# Altium PCB PCB.PcbDoc (part 5 of 10)
Units mm, origin at the board's own origin, x right, y up, seen from the top; angles counter-clockwise.
Board outline 100.5 x 147.95 mm, 6 copper layers (Top Layer, Layer 2 (GND), Layer 3, Layer 4, Layer 5 (AGND), Bottom Layer), stack 1.449 mm thick; 511 components, 297 nets, 1620 pads, 565 vias.
Unrouted connection lines stored in the file: 597.
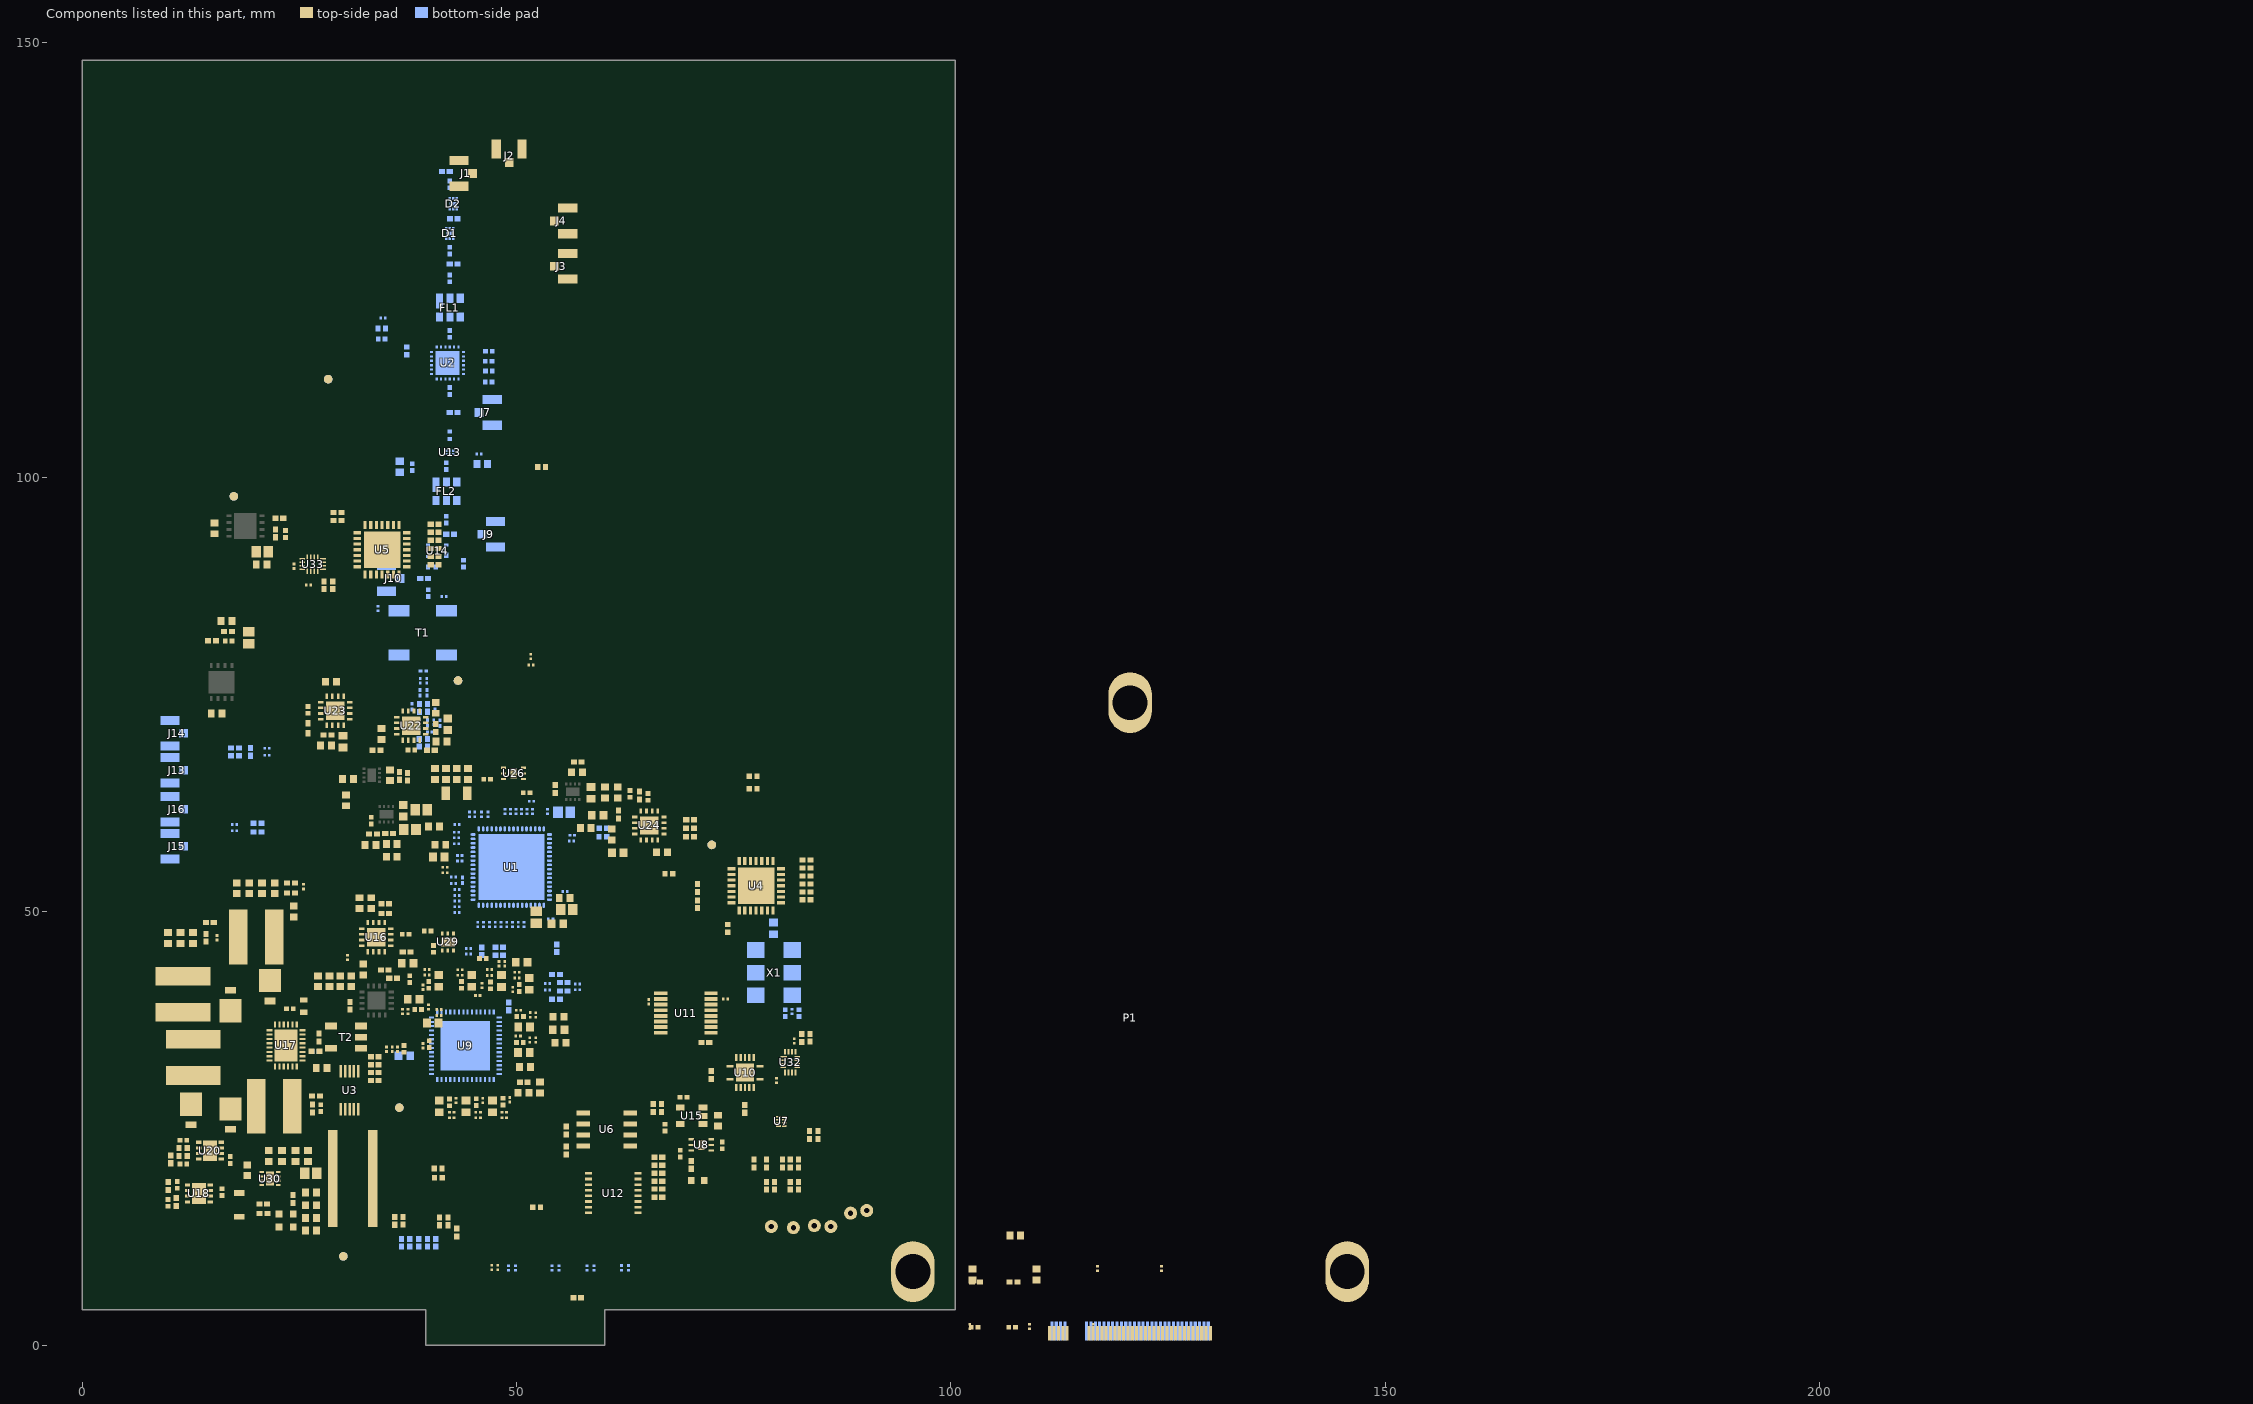
[diagram p4: the components of this part, seen from the top]

## Part data (continued)
R46: library part Resistor, Case Code (Imperial)=0603, Case Code (Metric)=1608, Manufacturer 1=Panasonic, Manufacturer Part Number 1=ERJ-3EKF15R0V, Max Operating Temperature=155°C, Max Power Dissipation=100mW, Min Operating Temperature=-55°C, Package Quantity=1, Supplier Part Number 1=P15.0HCT-ND, Temperature Coefficient=100ppm/°C, Tolerance=1%, Voltage Rating=75V, Case/Package=0603, ComponentLink1Description=https://datasheet.ciiva.com/30238/aoa0000ce2-30238940.pdf?src-supplier=Onlinecomponents.com, ComponentLink1URL=https://datasheet.ciiva.com/30238/aoa0000ce2-30238940.pdf?src-supplier=Onlinecomponents.com, ComponentLink2Description=https://datasheet.ciiva.com/5915/aoa0000ce2-5915293.pdf?src-supplier=Farnell, ComponentLink2URL=https://datasheet.ciiva.com/5915/aoa0000ce2-5915293.pdf?src-supplier=Farnell, ComponentLink3Description=https://datasheet.ciiva.com/9192/aoa0000ce2-9192958.pdf?src-supplier=Avnet, ComponentLink3URL=https://datasheet.ciiva.com/9192/aoa0000ce2-9192958.pdf?src-supplier=Avnet, ComponentLink4Description=https://datasheet.ciiva.com/46373/1678782-46373800.pdf?src-supplier=Element14, ComponentLink4URL=https://datasheet.ciiva.com/46373/1678782-46373800.pdf?src-supplier=Element14, ComponentLink5Description=https://datasheet.ciiva.com/46373/1678782-46373801.pdf?src-supplier=Element14, ComponentLink5URL=https://datasheet.ciiva.com/46373/1678782-46373801.pdf?src-supplier=Element14, ComponentLink6Description=https://datasheet.ciiva.com/16770/70260748-16770860.pdf?src-supplier=Allied+Electronics, ComponentLink6URL=https://datasheet.ciiva.com/16770/70260748-16770860.pdf?src-supplier=Allied+Electronics, ComponentLink7Description=https://datasheet.ciiva.com/22682/1678782-22682189.pdf?src-supplier=Element14, ComponentLink7URL=https://datasheet.ciiva.com/22682/1678782-22682189.pdf?src-supplier=Element14, Composition="Thick Film", Contact Plating=Tin, Depth=0.8mm, Features="Automotive AEC-Q200", Height=0.022inch, Lead Free="Lead Free", Length=1.6mm, Military Standard=Not, Mount="Surface Mount", Number of Pins=2, Number of Terminations=2, Packaging="Tape and Reel", Power Rating=100mW, Pricing 1="1=0.10000, 10=0.06500, 100=0.02640, 1000=0.01186, 2500=0.01029 (USD)", Radiation Hardening=No, REACH SVHC="No SVHC", Resistance=15R, RoHS=Yes, Stock 1=100546, Supplier 1=Digi-Key, Termination=SMD/SMT, Voltage Rating (DC)=75V, Weight=7.1E-05oz, Width=0.031inch, Working Voltage=75V
R50 R65 R86: library part Resistor, Case Code (Imperial)=0402, Case Code (Metric)=1005, Manufacturer 1=Susumu, Manufacturer Part Number 1=RR0510P-104-D, Max Operating Temperature=125°C, Max Power Dissipation=63mW, Min Operating Temperature=-55°C, Package Quantity=1, Supplier Part Number 1=RR05P100KDCT-ND, Temperature Coefficient=25ppm/°C, Tolerance=0.5%, Voltage Rating=25V, Case/Package=0402, ComponentLink1Description=https://datasheet.ciiva.com/2486/rr-data-sheet-2486809.pdf?src-supplier=Digi-Key, ComponentLink1URL=https://datasheet.ciiva.com/2486/rr-data-sheet-2486809.pdf?src-supplier=Digi-Key, ComponentLink2Description=https://datasheet.ciiva.com/2486/rr-data-sheet-2486810.pdf?src-supplier=Digi-Key, ComponentLink2URL=https://datasheet.ciiva.com/2486/rr-data-sheet-2486810.pdf?src-supplier=Digi-Key, ComponentLink3Description=https://datasheet.ciiva.com/2486/rr-data-sheet-2486811.pdf?src-supplier=Digi-Key, ComponentLink3URL=https://datasheet.ciiva.com/2486/rr-data-sheet-2486811.pdf?src-supplier=Digi-Key, Composition="Thin Film", Height=0.016inch, Lead Free="Lead Free", Length=0.039inch, Number of Pins=2, Number of Terminations=2, Packaging="Tape and Reel", Power Rating=63mW, Pricing 1="1=0.10000, 10=0.07400, 100=0.02850, 1000=0.01254, 2500=0.01083, 5000=0.00969 (USD)", REACH SVHC="No SVHC", Resistance=100kR, RoHS=Yes, Supplier 1=Digi-Key, Termination=SMD/SMT, Voltage Rating (DC)=25V, Width=0.02inch, Working Voltage=25V
  R50 R86: Stock 1=211732
  R65: Stock 1=221998
R51 R66: library part Resistor, Case Code (Imperial)=0402, Case Code (Metric)=1005, Manufacturer 1=Susumu, Manufacturer Part Number 1=RR0510P-2492-D, Max Operating Temperature=125°C, Max Power Dissipation=63mW, Min Operating Temperature=-55°C, Package Quantity=1, Power Rating=62.5mW, Supplier Part Number 1=RR05P24.9KDCT-ND, Temperature Coefficient=25ppm/°C, Tolerance=0.5%, Voltage Rating=25V, Voltage Rating (DC)=50V, Case/Package=0402, ComponentLink1Description=https://datasheet.ciiva.com/2525/rr-data-sheet-2525146.pdf?src-supplier=Digi-Key, ComponentLink1URL=https://datasheet.ciiva.com/2525/rr-data-sheet-2525146.pdf?src-supplier=Digi-Key, ComponentLink2Description=https://datasheet.ciiva.com/2525/rr-data-sheet-2525147.pdf?src-supplier=Digi-Key, ComponentLink2URL=https://datasheet.ciiva.com/2525/rr-data-sheet-2525147.pdf?src-supplier=Digi-Key, ComponentLink3Description=https://datasheet.ciiva.com/2525/rr-data-sheet-2525148.pdf?src-supplier=Digi-Key, ComponentLink3URL=https://datasheet.ciiva.com/2525/rr-data-sheet-2525148.pdf?src-supplier=Digi-Key, Composition="Thin Film", Height=0.016inch, Lead Free="Lead Free", Length=0.039inch, Number of Terminations=2, Packaging="Tape and Reel", Pricing 1="1=0.10000, 10=0.07400, 100=0.02850, 1000=0.01254, 2500=0.01083, 5000=0.00969 (USD)", Resistance=24.9kR, RoHS=Yes, Supplier 1=Digi-Key, Termination=SMD/SMT, Weight=2.3E-05oz, Width=0.5mm, Working Voltage=25V
  R51: Stock 1=39015
  R66: Stock 1=40830
R52: library part Resistor, Case/Package=0402, Manufacturer 1="Stackpole Electronics", Manufacturer Part Number 1=RNCF0402DTE21K5, Max Operating Temperature=155°C, Max Power Dissipation=63mW, Min Operating Temperature=-55°C, Package Quantity=10000, Supplier Part Number 1=RNCF0402DTE21K5CT-ND, Temperature Coefficient=25ppm/°C, Tolerance=0.5%, ComponentLink1Description=https://www.seielect.com/Catalog/SEI-RNCF.pdf?src-supplier=Digi-Key, ComponentLink1URL=https://www.seielect.com/Catalog/SEI-RNCF.pdf?src-supplier=Digi-Key, Composition="Thin Film", Features="Moisture Resistant", Height=0.016inch, Length=0.039inch, Mount="Surface Mount", Number of Terminations=2, Packaging="Tape and Reel", Pricing 1="1=0.13000, 10=0.11400, 25=0.07920, 50=0.06160, 100=0.04400, 250=0.03432, 500=0.02728, 1000=0.01936, 5000=0.01496 (USD)", Resistance=21.5kR, RoHS=Yes, Stock 1=19890, Supplier 1=Digi-Key, Width=0.02inch
R56: library part Resistor, "Thin Film Resistors 31.2kOhm,0402,0.5%,2 5ppm,63mW,50V", Case Code (Imperial)=0402, Case Code (Metric)=1005, Manufacturer="KOA Speer", Manufacturer Part Number=RN73H1ETTP3122D25, Max Operating Temperature=155°C, Min Operating Temperature=-55°C, Power Rating=63mW, Supplier Part Number 1=2019-RN73H1ETTP3122D25CT-ND, Temperature Coefficient=25ppm/°C, Tolerance=0.5%, Voltage Rating=50V, Case/Package=0402, Category=Resistors, ComponentLink1Description=http://www.mouser.com/ds/2/219/RN73H-12200.pdf?src-supplier=Mouser, ComponentLink1URL=http://www.mouser.com/ds/2/219/RN73H-12200.pdf?src-supplier=Mouser, Composition="Metal Film", Height=0.35mm, Length=1mm, Packaging="Tape and Reel", Pricing 1="1=0,49000, 10=0,37200, 100=0,15630, 1000=0,08624, 2500=0,08085, 5000=0,07330 (USD)", Resistance=31.2kR, RoHS=No, Stock 1=14677, Supplier 1=Digi-Key, Termination=SMD/SMT, Voltage Rating (DC)=50V, Weight=2.3E-05oz, Width=0.5mm
R57: library part Resistor, Case Code (Imperial)=0402, Case Code (Metric)=1005, Manufacturer 1=Susumu, Manufacturer Part Number 1=RR0510P-1822-D, Max Operating Temperature=125°C, Max Power Dissipation=63mW, Min Operating Temperature=-55°C, Package Quantity=1, Power Rating=62.5mW, Supplier Part Number 1=RR05P18.2KDCT-ND, Temperature Coefficient=25ppm/°C, Tolerance=0.5%, Voltage Rating=25V, Voltage Rating (DC)=50V, Case/Package=0402, ComponentLink1Description=https://datasheet.ciiva.com/2494/rr-data-sheet-2494006.pdf?src-supplier=Digi-Key, ComponentLink1URL=https://datasheet.ciiva.com/2494/rr-data-sheet-2494006.pdf?src-supplier=Digi-Key, ComponentLink2Description=https://datasheet.ciiva.com/2494/rr-data-sheet-2494007.pdf?src-supplier=Digi-Key, ComponentLink2URL=https://datasheet.ciiva.com/2494/rr-data-sheet-2494007.pdf?src-supplier=Digi-Key, ComponentLink3Description=https://datasheet.ciiva.com/2494/rr-data-sheet-2494008.pdf?src-supplier=Digi-Key, ComponentLink3URL=https://datasheet.ciiva.com/2494/rr-data-sheet-2494008.pdf?src-supplier=Digi-Key, Composition="Thin Film", Height=0.016inch, Lead Free="Lead Free", Length=0.039inch, Number of Terminations=2, Packaging="Tape and Reel", Pricing 1="1=0.10000, 10=0.07400, 100=0.02850, 1000=0.01254, 2500=0.01083, 5000=0.00969 (USD)", Resistance=18.2kR, RoHS=Yes, Stock 1=48500, Supplier 1=Digi-Key, Termination=SMD/SMT, Width=0.02inch
R59: library part Resistor, Case Code (Imperial)=0402, Case Code (Metric)=1005, Manufacturer 1=Panasonic, Manufacturer Part Number 1=ERA-2AEB6192X, Max Operating Temperature=155°C, Max Power Dissipation=63mW, Min Operating Temperature=-55°C, Package Quantity=1, Supplier Part Number 1=P61.9KDCCT-ND, Temperature Coefficient=25ppm/°C, Tolerance=0.1%, Voltage Rating=25V, Voltage Rating (DC)=50V, Case/Package=0402, ComponentLink1Description=https://datasheet.ciiva.com/24058/aoa0000ce26-32660-24058744.pdf?src-supplier=Mouser, ComponentLink1URL=https://datasheet.ciiva.com/24058/aoa0000ce26-32660-24058744.pdf?src-supplier=Mouser, Composition="Thin Film,Metal Film", Contact Plating=Tin, Features="Automotive AEC-Q200", Height=0.016inch, Lead Free="Lead Free", Length=0.039inch, Mount="Surface Mount", Number of Terminations=2, Packaging="Tape and Reel", Power Rating=63mW, Pricing 1="1=0.45000, 10=0.32100, 100=0.12830, 1000=0.06322, 2500=0.05858, 5000=0.05300 (USD)", Radiation Hardening=No, REACH SVHC=Unknown, Resistance=61.9kR, RoHS=Yes, Stock 1=12743, Supplier 1=Digi-Key, Termination=SMD/SMT, Width=0.02inch
R60: library part Resistor, Case Code (Imperial)=0402, Case Code (Metric)=1005, Manufacturer 1=Panasonic, Manufacturer Part Number 1=ERA-2AEB1052X, Max Operating Temperature=155°C, Max Power Dissipation=63mW, Min Operating Temperature=-55°C, Package Quantity=1, Supplier Part Number 1=P10.5KDCCT-ND, Temperature Coefficient=25ppm/°C, Tolerance=0.1%, Voltage Rating=25V, Voltage Rating (DC)=50V, Case/Package=0402, ComponentLink1Description=http://www.mouser.com/ds/2/315/AOA0000CE26-32660.pdf?src-supplier=Mouser, ComponentLink1URL=http://www.mouser.com/ds/2/315/AOA0000CE26-32660.pdf?src-supplier=Mouser, ComponentLink2Description=https://media.digikey.com/pdf/Data%20Sheets/Panasonic%20Resistors%20Thermistors%20PDFs/ERA_Series_LE.pdf?src-supplier=Digi-Key, ComponentLink2URL=https://media.digikey.com/pdf/Data%20Sheets/Panasonic%20Resistors%20Thermistors%20PDFs/ERA_Series_LE.pdf?src-supplier=Digi-Key, ComponentLink3Description=http://www.onlinecomponents.com/datasheet/era-2aeb1052x.aspx?p=44473930&src-supplier=Onlinecomponents.com, ComponentLink3URL=http://www.onlinecomponents.com/datasheet/era-2aeb1052x.aspx?p=44473930&src-supplier=Onlinecomponents.com, ComponentLink4Description=http://www.farnell.com/datasheets/2052875.pdf?src-supplier=Newark, ComponentLink4URL=http://www.farnell.com/datasheets/2052875.pdf?src-supplier=Newark, ComponentLink5Description=https://industrial.panasonic.com/cdbs/www-data/pdf/RDM0000/AOA0000C307.pdf?src-supplier=Digi-Key, ComponentLink5URL=https://industrial.panasonic.com/cdbs/www-data/pdf/RDM0000/AOA0000C307.pdf?src-supplier=Digi-Key, Composition="Metal Film,Thin Film", Features="Automotive AEC-Q200", Height=0.016inch, Lead Free="Lead Free", Length=0.039inch, Mount="Surface Mount", Number of Terminations=2, Packaging="Tape and Reel", Power Rating=63mW, Pricing 1="1=0.45000, 10=0.32100, 100=0.12830, 1000=0.06322, 2500=0.05858, 5000=0.05300 (USD)", Resistance=10.5kR, RoHS=Yes, Stock 1=29203, Supplier 1=Digi-Key, Termination=SMD/SMT, Width=0.5mm
R61: library part Resistor, Case Code (Imperial)=0402, Case Code (Metric)=1005, Manufacturer 1=Susumu, Manufacturer Part Number 1=RR0510P-4021-D, Max Operating Temperature=125°C, Max Power Dissipation=63mW, Min Operating Temperature=-55°C, Package Quantity=10000, Power Rating=62.5mW, Supplier Part Number 1=RR05P4.02KDCT-ND, Temperature Coefficient=25ppm/°C, Tolerance=0.5%, Voltage Rating=25V, Voltage Rating (DC)=50V, Case/Package=0402, ComponentLink1Description=https://datasheet.ciiva.com/2494/rr-data-sheet-2494048.pdf?src-supplier=Digi-Key, ComponentLink1URL=https://datasheet.ciiva.com/2494/rr-data-sheet-2494048.pdf?src-supplier=Digi-Key, ComponentLink2Description=https://datasheet.ciiva.com/2494/rr-data-sheet-2494049.pdf?src-supplier=Digi-Key, ComponentLink2URL=https://datasheet.ciiva.com/2494/rr-data-sheet-2494049.pdf?src-supplier=Digi-Key, ComponentLink3Description=https://datasheet.ciiva.com/2494/rr-data-sheet-2494050.pdf?src-supplier=Digi-Key, ComponentLink3URL=https://datasheet.ciiva.com/2494/rr-data-sheet-2494050.pdf?src-supplier=Digi-Key, Composition="Thin Film", Height=0.016inch, Lead Free="Lead Free", Length=0.039inch, Number of Terminations=2, Packaging="Tape and Reel", Pricing 1="1=0.10000, 10=0.07400, 100=0.02850, 1000=0.01254, 2500=0.01083, 5000=0.00969 (USD)", Resistance=4.02kR, RoHS=Yes, Stock 1=40212, Supplier 1=Digi-Key, Termination=SMD/SMT, Width=0.02inch
R62 R64 R100: library part Resistor, Case Code (Imperial)=0402, Case Code (Metric)=1005, Manufacturer 1=Susumu, Manufacturer Part Number 1=RR0510P-102-D, Max Operating Temperature=125°C, Max Power Dissipation=63mW, Min Operating Temperature=-55°C, Package Quantity=1, Supplier Part Number 1=RR05P1.0KDCT-ND, Temperature Coefficient=25ppm/°C, Tolerance=0.5%, Voltage Rating=25V, Case/Package=0402, ComponentLink1Description=https://datasheet.ciiva.com/2486/rr-data-sheet-2486776.pdf?src-supplier=Digi-Key, ComponentLink1URL=https://datasheet.ciiva.com/2486/rr-data-sheet-2486776.pdf?src-supplier=Digi-Key, ComponentLink2Description=https://datasheet.ciiva.com/2486/rr-data-sheet-2486777.pdf?src-supplier=Digi-Key, ComponentLink2URL=https://datasheet.ciiva.com/2486/rr-data-sheet-2486777.pdf?src-supplier=Digi-Key, ComponentLink3Description=https://datasheet.ciiva.com/2486/rr-data-sheet-2486778.pdf?src-supplier=Digi-Key, ComponentLink3URL=https://datasheet.ciiva.com/2486/rr-data-sheet-2486778.pdf?src-supplier=Digi-Key, ComponentLink4Description=https://datasheet.ciiva.com/7984/1581132-7984302.pdf?src-supplier=Element14, ComponentLink4URL=https://datasheet.ciiva.com/7984/1581132-7984302.pdf?src-supplier=Element14, Composition="Thin Film", Height=0.016inch, Lead Free="Lead Free", Length=0.039inch, Number of Pins=2, Number of Terminations=2, Packaging="Tape and Reel", Power Rating=63mW, Pricing 1="1=0.10000, 10=0.07400, 100=0.02850, 1000=0.01254, 2500=0.01083, 5000=0.00969 (USD)", REACH SVHC=Unknown, Resistance=1kR, RoHS=Yes, Stock 1=1157935, Supplier 1=Digi-Key, Termination=SMD/SMT, Voltage Rating (DC)=25V, Width=0.02inch
R63: library part Resistor, Case Code (Imperial)=0402, Case Code (Metric)=1005, Manufacturer 1="Stackpole Electronics", Manufacturer Part Number 1=RMCF0402FT1K80, Max Operating Temperature=155°C, Max Power Dissipation=63mW, Min Operating Temperature=-55°C, Supplier Part Number 1=RMCF0402FT1K80CT-ND, Temperature Coefficient=100ppm/°C, Tolerance=1%, Case/Package=0402, ComponentLink1Description=https://www.seielect.com/catalog/SEI-Packaging.pdf?src-supplier=Digi-Key, ComponentLink1URL=https://www.seielect.com/catalog/SEI-Packaging.pdf?src-supplier=Digi-Key, ComponentLink2Description=https://www.seielect.com/Catalog/SEI-RMCF_RMCP.pdf?src-supplier=Digi-Key, ComponentLink2URL=https://www.seielect.com/Catalog/SEI-RMCF_RMCP.pdf?src-supplier=Digi-Key, ComponentLink3Description=https://www.seielect.com/Catalog/SEI-RMCF_RMCP.pdf?src-supplier=Avnet, ComponentLink3URL=https://www.seielect.com/Catalog/SEI-RMCF_RMCP.pdf?src-supplier=Avnet, Composition="Thick Film", Contact Plating=Tin,Matte, Features="Automotive AEC-Q200", Height=0.016inch, Lead Free="Lead Free", Length=0.039inch, Mount="Surface Mount", Number of Terminations=2, Packaging="Cut Tape", Pricing 1="1=0.10000, 10=0.01500, 100=0.00610, 1000=0.00275, 2500=0.00239, 5000=0.00198 (USD)", Resistance=1.8kR, RoHS=Yes, Stock 1=126808, Supplier 1=Digi-Key, Width=0.02inch
R67 R69: library part Resistor, Case Code (Imperial)=0402, Case Code (Metric)=1005, Manufacturer 1=Susumu, Manufacturer Part Number 1=RR0510P-152-D, Max Operating Temperature=125°C, Max Power Dissipation=63mW, Min Operating Temperature=-55°C, Package Quantity=10000, Supplier Part Number 1=RR05P1.5KDCT-ND, Temperature Coefficient=25ppm/°C, Tolerance=0.5%, Voltage Rating=25V, Case/Package=0402, ComponentLink1Description=https://datasheet.ciiva.com/2486/rr-data-sheet-2486848.pdf?src-supplier=Digi-Key, ComponentLink1URL=https://datasheet.ciiva.com/2486/rr-data-sheet-2486848.pdf?src-supplier=Digi-Key, ComponentLink2Description=https://datasheet.ciiva.com/2486/rr-data-sheet-2486849.pdf?src-supplier=Digi-Key, ComponentLink2URL=https://datasheet.ciiva.com/2486/rr-data-sheet-2486849.pdf?src-supplier=Digi-Key, ComponentLink3Description=https://datasheet.ciiva.com/2486/rr-data-sheet-2486850.pdf?src-supplier=Digi-Key, ComponentLink3URL=https://datasheet.ciiva.com/2486/rr-data-sheet-2486850.pdf?src-supplier=Digi-Key, Composition="Thin Film", Height=0.016inch, Lead Free="Lead Free", Length=0.039inch, Number of Pins=2, Number of Terminations=2, Packaging="Tape and Reel", Power Rating=63mW, Pricing 1="1=0.10000, 10=0.07400, 100=0.02850, 1000=0.01254, 2500=0.01083, 5000=0.00969 (USD)", REACH SVHC="No SVHC", Resistance=1.5kR, RoHS=Yes, Stock 1=197689, Supplier 1=Digi-Key, Termination=SMD/SMT, Voltage Rating (DC)=25V, Width=0.02inch, Working Voltage=25V
R68 R70: library part Resistor, Case Code (Imperial)=0402, Case Code (Metric)=1005, Manufacturer 1="Vishay Dale", Manufacturer Part Number 1=CRCW04021K00DHEDP, Max Operating Temperature=155°C, Max Power Dissipation=63mW, Min Operating Temperature=-55°C, Package Quantity=1, Supplier Part Number 1=541-1.0KAVCT-ND, Temperature Coefficient=50ppm/°C, Tolerance=0.5%, Case/Package=0402, ComponentLink1Description=https://datasheet.ciiva.com/6544/dcrcwpe3-6544918.pdf?src-supplier=Digi-Key, ComponentLink1URL=https://datasheet.ciiva.com/6544/dcrcwpe3-6544918.pdf?src-supplier=Digi-Key, Composition="Thick Film", Depth=0.5mm, Features="Automotive AEC-Q200", Height=0.016inch, Length=0.039inch, Military Standard=Not, Number of Terminations=2, Packaging="Tape and Reel", Pricing 1="1=0.30000, 10=0.25400, 100=0.09930, 1000=0.04158, 2500=0.03812, 5000=0.03465 (USD)", Resistance=1kR, RoHS=Yes, Stock 1=37274, Supplier 1=Digi-Key, Width=0.02inch
R71 R73: library part Resistor, Case Code (Imperial)=0402, Case Code (Metric)=1005, Manufacturer 1=Panasonic, Manufacturer Part Number 1=ERA-2AEB4991X, Max Operating Temperature=155°C, Max Power Dissipation=63mW, Min Operating Temperature=-55°C, Package Quantity=1, Power Rating=62.5mW, Supplier Part Number 1=P4.99KDCCT-ND, Temperature Coefficient=25ppm/°C, Tolerance=0.1%, Voltage Rating=50V, Case/Package=0402, ComponentLink1Description=https://datasheet.ciiva.com/30094/54aoa0000ce26-30094171.pdf?src-supplier=Onlinecomponents.com, ComponentLink1URL=https://datasheet.ciiva.com/30094/54aoa0000ce26-30094171.pdf?src-supplier=Onlinecomponents.com, Composition="Thin Film", Features="Automotive AEC-Q200", Height=0.016inch, Lead Free="Lead Free", Length=0.039inch, Mount="Surface Mount", Number of Terminations=2, Packaging="Tape and Reel", Pricing 1="1=0.45000, 10=0.32100, 100=0.12830, 1000=0.06322, 2500=0.05858, 5000=0.05300 (USD)", REACH SVHC=Unknown, Resistance=4.99kR, RoHS=Yes, Stock 1=156122, Supplier 1=Digi-Key, Voltage Rating (DC)=50V, Width=0.02inch
R72 R74: library part Resistor, Case Code (Imperial)=0402, Case Code (Metric)=1005, Manufacturer 1=Panasonic, Manufacturer Part Number 1=ERA-2AEB3321X, Max Operating Temperature=155°C, Max Power Dissipation=63mW, Min Operating Temperature=-55°C, Package Quantity=10000, Supplier Part Number 1=P3.32KDCCT-ND, Temperature Coefficient=25ppm/°C, Tolerance=0.1%, Voltage Rating=25V, Voltage Rating (DC)=50V, Case/Package=0402, ComponentLink1Description=http://components.arrow.com/part/dataview/0323_02923244?src-supplier=Arrow+Europe, ComponentLink1URL=http://components.arrow.com/part/dataview/0323_02923244?src-supplier=Arrow+Europe, ComponentLink2Description=http://www.mouser.com/ds/2/315/AOA0000C237-1100991.pdf?src-supplier=Mouser, ComponentLink2URL=http://www.mouser.com/ds/2/315/AOA0000C237-1100991.pdf?src-supplier=Mouser, ComponentLink3Description=https://industrial.panasonic.com/cdbs/www-data/pdf/RDM0000/AOA0000C307.pdf?src-supplier=Digi-Key, ComponentLink3URL=https://industrial.panasonic.com/cdbs/www-data/pdf/RDM0000/AOA0000C307.pdf?src-supplier=Digi-Key, ComponentLink4Description=http://www.farnell.com/datasheets/2052875.pdf?src-supplier=Newark, ComponentLink4URL=http://www.farnell.com/datasheets/2052875.pdf?src-supplier=Newark, ComponentLink5Description=http://www.onlinecomponents.com/datasheet/era-2aeb3321x.aspx?p=44473698&src-supplier=Onlinecomponents.com, ComponentLink5URL=http://www.onlinecomponents.com/datasheet/era-2aeb3321x.aspx?p=44473698&src-supplier=Onlinecomponents.com, ComponentLink6Description=http://www.farnell.com/datasheets/1818319.pdf?src-supplier=Element14, ComponentLink6URL=http://www.farnell.com/datasheets/1818319.pdf?src-supplier=Element14, Composition="Thin Film,Metal Film", Depth=0.5mm, Features="Automotive AEC-Q200", Height=0.016inch, Lead Free="Lead Free", Length=1mm, Military Standard=Not, Mount="Surface Mount", Number of Terminations=2, Packaging="Tape and Reel", Power Rating=63mW, Pricing 1="1=0.45000, 10=0.32100, 100=0.12830, 1000=0.06322, 2500=0.05858, 5000=0.05300 (USD)", REACH SVHC=Unknown, Resistance=3.32kR, RoHS=Yes, Stock 1=29723, Supplier 1=Digi-Key, Width=0.02inch
R75: library part Resistor, Case Code (Imperial)=0402, Case Code (Metric)=1005, Manufacturer 1=Yageo, Manufacturer Part Number 1=AC0402FR-0756KL, Max Operating Temperature=155°C, Max Power Dissipation=63mW, Min Operating Temperature=-55°C, Supplier Part Number 1=YAG3501CT-ND, Temperature Coefficient=100ppm/°C, Tolerance=1%, Case/Package=0402, ComponentLink1Description=http://www.yageo.com/documents/recent/PYu-AC_51_RoHS_L_2_revised.pdf?src-supplier=Future+Electronics, ComponentLink1URL=http://www.yageo.com/documents/recent/PYu-AC_51_RoHS_L_2_revised.pdf?src-supplier=Future+Electronics, ComponentLink2Description=http://www.yageo.com/NewPortal/yageodocoutput?fileName=/pdf/R-Chip/PYu-AC_51_RoHS_L_6.pdf&src-supplier=Digi-Key, ComponentLink2URL=http://www.yageo.com/NewPortal/yageodocoutput?fileName=/pdf/R-Chip/PYu-AC_51_RoHS_L_6.pdf&src-supplier=Digi-Key, Composition="Thick Film", Features="Moisture Resistant,Automotive AEC-Q200", Height=0.015inch, Lead Free="Lead Free", Length=0.039inch, Number of Terminations=2, Packaging="Tape and Reel", Power Rating=63mW, Pricing 1="1=0.10000, 10=0.02200, 100=0.00900, 1000=0.00403, 2500=0.00350, 5000=0.00289 (USD)", Resistance=56kR, RoHS=Yes, Stock 1=69752, Supplier 1=Digi-Key, Width=0.02inch
R76: library part Resistor, Case Code (Imperial)=0402, Case Code (Metric)=1005, Manufacturer 1=Yageo, Manufacturer Part Number 1=RC0402FR-0710KL, Max Operating Temperature=155°C, Min Operating Temperature=-55°C, Power Rating=62.5mW, Supplier Part Number 1=311-10.0KLRCT-ND, Temperature Coefficient=100ppm/°C, Tolerance=1%, Voltage Rating=50V, Case/Package=0402, ComponentLink1Description=https://datasheet.ciiva.com/7660/38568-7660787.pdf?src-supplier=Element14, ComponentLink1URL=https://datasheet.ciiva.com/7660/38568-7660787.pdf?src-supplier=Element14, ComponentLink2Description=https://datasheet.ciiva.com/7849/1784430-7849813.pdf?src-supplier=Element14, ComponentLink2URL=https://datasheet.ciiva.com/7849/1784430-7849813.pdf?src-supplier=Element14, ComponentLink3Description=https://datasheet.ciiva.com/7849/1686128-7849814.pdf?src-supplier=Element14, ComponentLink3URL=https://datasheet.ciiva.com/7849/1686128-7849814.pdf?src-supplier=Element14, ComponentLink4Description=https://datasheet.ciiva.com/7849/1784430-7849815.pdf?src-supplier=Element14, ComponentLink4URL=https://datasheet.ciiva.com/7849/1784430-7849815.pdf?src-supplier=Element14, ComponentLink5Description=https://datasheet.ciiva.com/22747/1018594-22747512.pdf?src-supplier=Element14, ComponentLink5URL=https://datasheet.ciiva.com/22747/1018594-22747512.pdf?src-supplier=Element14, ComponentLink6Description=https://datasheet.ciiva.com/12667/pyu-rc0402-51-rohs-l-6-r-12667067.pdf?src-supplier=Mouser, ComponentLink6URL=https://datasheet.ciiva.com/12667/pyu-rc0402-51-rohs-l-6-r-12667067.pdf?src-supplier=Mouser, ComponentLink7Description=https://datasheet.ciiva.com/7983/1018594-7983486.pdf?src-supplier=Element14, ComponentLink7URL=https://datasheet.ciiva.com/7983/1018594-7983486.pdf?src-supplier=Element14, Composition="Thick Film", Depth=0.5mm, Height=0.32mm, Lead Free="Lead Free", Lead Pitch=0.2mm, Length=1mm, Military Standard=Not, Number of Pins=2, Number of Terminations=2, Packaging="Tape and Reel", Pricing 1="1=0.10000, 10=0.01500, 100=0.00630, 1000=0.00281, 2500=0.00244, 5000=0.00201 (USD)", REACH SVHC="No SVHC", Resistance=10kR, RoHS=Yes, Stock 1=77736196, Supplier 1=Digi-Key, Termination=SMD/SMT, Voltage Rating (DC)=50V, Width=0.5mm, Working Voltage=50V
R80 R82: library part Resistor, Case Code (Imperial)=0402, Case Code (Metric)=1005, Manufacturer 1=Panasonic, Manufacturer Part Number 1=ERA-2AED753X, Max Operating Temperature=155°C, Max Power Dissipation=63mW, Min Operating Temperature=-55°C, Package Quantity=1, Supplier Part Number 1=P75KDECT-ND, Temperature Coefficient=25ppm/°C, Tolerance=0.5%, Voltage Rating=25V, Case/Package=0402, ComponentLink1Description=https://datasheet.ciiva.com/9187/aoa0000ce26-9187754.pdf?src-supplier=Avnet, ComponentLink1URL=https://datasheet.ciiva.com/9187/aoa0000ce26-9187754.pdf?src-supplier=Avnet, Composition="Thin Film,Metal Film", Contact Plating=Tin, Features="Automotive AEC-Q200", Height=0.016inch, Lead Free="Lead Free", Length=0.039inch, Mount="Surface Mount", Number of Terminations=2, Packaging="Tape and Reel", Power Rating=63mW, Pricing 1="1=0.22000, 10=0.18800, 100=0.07350, 1000=0.03077, 2500=0.02820, 5000=0.02564 (USD)", Resistance=75kR, RoHS=Yes, Stock 1=38844, Supplier 1=Digi-Key, Width=0.02inch
R81 R85: library part Resistor, Case Code (Imperial)=0402, Case Code (Metric)=1005, Manufacturer 1=Panasonic, Manufacturer Part Number 1=ERA-2AEB1072X, Max Operating Temperature=155°C, Max Power Dissipation=63mW, Min Operating Temperature=-55°C, Package Quantity=1, Supplier Part Number 1=P10.7KDCCT-ND, Temperature Coefficient=25ppm/°C, Tolerance=0.1%, Voltage Rating=25V, Voltage Rating (DC)=50V, Case/Package=0402, ComponentLink1Description=https://datasheet.ciiva.com/24064/aoa0000ce26-32660-24064664.pdf?src-supplier=Mouser, ComponentLink1URL=https://datasheet.ciiva.com/24064/aoa0000ce26-32660-24064664.pdf?src-supplier=Mouser, Composition="Thin Film,Metal Film", Depth=0.5mm, Features="Automotive AEC-Q200", Height=0.016inch, Lead Free="Lead Free", Length=1mm, Military Standard=Not, Mount="Surface Mount", Number of Terminations=2, Packaging="Tape and Reel", Power Rating=63mW, Pricing 1="1=0.45000, 10=0.32100, 100=0.12830, 1000=0.06322, 2500=0.05858, 5000=0.05300 (USD)", REACH SVHC=Unknown, Resistance=10.7kR, RoHS=Yes, Stock 1=79156, Supplier 1=Digi-Key, Termination=SMD/SMT, Width=0.02inch
R87 R95: library part Resistor, Case Code (Imperial)=0402, Case Code (Metric)=1005, Manufacturer 1=Yageo, Manufacturer Part Number 1=RC0402FR-07100RL, Max Operating Temperature=155°C, Min Operating Temperature=-55°C, Power Rating=62.5mW, Supplier Part Number 1=311-100LRCT-ND, Temperature Coefficient=100ppm/°C, Tolerance=1%, Voltage Rating=50V, Case/Package=0402, ComponentLink1Description=https://datasheet.ciiva.com/7849/1784430-7849810.pdf?src-supplier=Element14, ComponentLink1URL=https://datasheet.ciiva.com/7849/1784430-7849810.pdf?src-supplier=Element14, ComponentLink2Description=https://datasheet.ciiva.com/11808/0900766b80c66297-11808765.pdf?src-supplier=RSComponents, ComponentLink2URL=https://datasheet.ciiva.com/11808/0900766b80c66297-11808765.pdf?src-supplier=RSComponents, ComponentLink3Description=https://datasheet.ciiva.com/12667/pyu-rc0402-51-rohs-l-6-r-12667957.pdf?src-supplier=Mouser, ComponentLink3URL=https://datasheet.ciiva.com/12667/pyu-rc0402-51-rohs-l-6-r-12667957.pdf?src-supplier=Mouser, ComponentLink4Description=https://datasheet.ciiva.com/16740/pyu-rc0402-51-rohs-l-6-r-16740566.pdf?src-supplier=Future+Electronics, ComponentLink4URL=https://datasheet.ciiva.com/16740/pyu-rc0402-51-rohs-l-6-r-16740566.pdf?src-supplier=Future+Electronics, ComponentLink5Description=https://datasheet.ciiva.com/15189/getdatasheetpartid-329466-15189335.pdf?src-supplier=Verical, ComponentLink5URL=https://datasheet.ciiva.com/15189/getdatasheetpartid-329466-15189335.pdf?src-supplier=Verical, ComponentLink6Description=https://datasheet.ciiva.com/22747/1018594-22747511.pdf?src-supplier=Element14, ComponentLink6URL=https://datasheet.ciiva.com/22747/1018594-22747511.pdf?src-supplier=Element14, ComponentLink7Description=https://datasheet.ciiva.com/28367/1018594-28367226.pdf?src-supplier=Element14, ComponentLink7URL=https://datasheet.ciiva.com/28367/1018594-28367226.pdf?src-supplier=Element14, Composition="Thick Film", Depth=0.5mm, Height=0.32mm, Lead Free="Lead Free", Length=1mm, Military Standard=Not, Number of Pins=2, Packaging="Tape and Reel", Pricing 1="1=0.10000, 10=0.01600, 100=0.00640, 1000=0.00286, 2500=0.00248, 5000=0.00205 (USD)", REACH SVHC="No SVHC", Resistance=100R, RoHS=Yes, Stock 1=45915826, Supplier 1=Digi-Key, Termination=SMD/SMT, Voltage Rating (DC)=50V, Width=0.5mm
R88: library part Resistor, Case Code (Imperial)=0402, Case Code (Metric)=1005, Manufacturer 1=Yageo, Manufacturer Part Number 1=RT0402DRE0738K3L, Max Operating Temperature=155°C, Max Power Dissipation=63mW, Min Operating Temperature=-55°C, Supplier Part Number 1=311-2278-1-ND, Temperature Coefficient=50ppm/°C, Tolerance=0.5%, Voltage Rating (DC)=50V, Case/Package=0402, ComponentLink1Description=http://www.yageo.com/documents/recent/PYu-RT_1-to-0.01_RoHS_L_9.pdf?src-supplier=Digi-Key, ComponentLink1URL=http://www.yageo.com/documents/recent/PYu-RT_1-to-0.01_RoHS_L_9.pdf?src-supplier=Digi-Key, ComponentLink2Description=http://www.yageo.com/documents/recent/PYu-RT_1-to-0.05_RoHS_L_(4).pdf?src-supplier=Future+Electronics, ComponentLink2URL=http://www.yageo.com/documents/recent/PYu-RT_1-to-0.05_RoHS_L_(4).pdf?src-supplier=Future+Electronics, Composition="Thin Film", Features="Moisture Resistant", Height=0.014inch, Lead Free="Lead Free", Length=0.039inch, Number of Terminations=2, Packaging="Tape and Reel", Power Rating=63mW, Pricing 1="1=0.20000, 10=0.16700, 100=0.06510, 1000=0.02725, 2500=0.02498, 5000=0.02271 (USD)", Resistance=38.3kR, RoHS=Yes, Stock 1=29643, Supplier 1=Digi-Key, Width=0.02inch
R102 R106 R107 R108 R109 R136 R137: library part Resistor, Case Code (Imperial)=0402, Case Code (Metric)=1005, Manufacturer 1=Yageo, Manufacturer Part Number 1=RC0402FR-07100KL, Max Operating Temperature=155°C, Max Power Dissipation=63mW, Min Operating Temperature=-55°C, Package Quantity=1, Supplier Part Number 1=311-100KLRCT-ND, Temperature Coefficient=100ppm/°C, Tolerance=1%, Voltage Rating=50V, Case/Package=0402, ComponentLink1Description=https://datasheet.ciiva.com/11819/0900766b80c66297-11819452.pdf?src-supplier=RSComponents, ComponentLink1URL=https://datasheet.ciiva.com/11819/0900766b80c66297-11819452.pdf?src-supplier=RSComponents, ComponentLink2Description=https://datasheet.ciiva.com/2453/pyu-r-int-thick-7-2453361.pdf?src-supplier=Digi-Key, ComponentLink2URL=https://datasheet.ciiva.com/2453/pyu-r-int-thick-7-2453361.pdf?src-supplier=Digi-Key, ComponentLink3Description=https://datasheet.ciiva.com/2453/pyu-r-int-thick-7-2453362.pdf?src-supplier=Digi-Key, ComponentLink3URL=https://datasheet.ciiva.com/2453/pyu-r-int-thick-7-2453362.pdf?src-supplier=Digi-Key, ComponentLink4Description=https://datasheet.ciiva.com/2453/pyu-r-int-thick-7-2453363.pdf?src-supplier=Digi-Key, ComponentLink4URL=https://datasheet.ciiva.com/2453/pyu-r-int-thick-7-2453363.pdf?src-supplier=Digi-Key, ComponentLink5Description=https://datasheet.ciiva.com/22747/1018594-22747509.pdf?src-supplier=Element14, ComponentLink5URL=https://datasheet.ciiva.com/22747/1018594-22747509.pdf?src-supplier=Element14, ComponentLink6Description=https://datasheet.ciiva.com/15189/getdatasheetpartid-323696-15189334.pdf?src-supplier=Verical, ComponentLink6URL=https://datasheet.ciiva.com/15189/getdatasheetpartid-323696-15189334.pdf?src-supplier=Verical, ComponentLink7Description=https://datasheet.ciiva.com/12667/pyu-rc0402-51-rohs-l-6-r-12667930.pdf?src-supplier=Mouser, ComponentLink7URL=https://datasheet.ciiva.com/12667/pyu-rc0402-51-rohs-l-6-r-12667930.pdf?src-supplier=Mouser, Composition="Thick Film", Depth=0.5mm, Features="Moisture Resistant", Height=0.016inch, Lead Free="Lead Free", Length=0.039inch, Military Standard=Not, Number of Terminations=2, Packaging="Tape and Reel", Power Rating=63mW, Pricing 1="1=0,10000, 10=0,01500, 100=0,00600, 1000=0,00270, 2500=0,00235, 5000=0,00194 (USD)", REACH SVHC="No SVHC", Resistance=100kR, RoHS=Yes, Stock 1=51358973, Supplier 1=Digi-Key, Termination=SMD/SMT, Width=0.02inch, Working Voltage=50V
R103 R110: library part Resistor, Case Code (Imperial)=0402, Case Code (Metric)=1005, Manufacturer 1=Panasonic, Manufacturer Part Number 1=ERA-2AED104X, Max Operating Temperature=155°C, Max Power Dissipation=63mW, Min Operating Temperature=-55°C, Package Quantity=10000, Supplier Part Number 1=P100KDECT-ND, Temperature Coefficient=25ppm/°C, Tolerance=0.5%, Voltage Rating=25V, Case/Package=0402, ComponentLink1Description=https://datasheet.ciiva.com/24028/aoa0000ce26-197354-24028150.pdf?src-supplier=Mouser, ComponentLink1URL=https://datasheet.ciiva.com/24028/aoa0000ce26-197354-24028150.pdf?src-supplier=Mouser, ComponentLink2Description=https://datasheet.ciiva.com/43470/1776116-43470438.pdf?src-supplier=Farnell, ComponentLink2URL=https://datasheet.ciiva.com/43470/1776116-43470438.pdf?src-supplier=Farnell, ComponentLink3Description=https://datasheet.ciiva.com/7830/1776116-7830920.pdf?src-supplier=Element14, ComponentLink3URL=https://datasheet.ciiva.com/7830/1776116-7830920.pdf?src-supplier=Element14, ComponentLink4Description=https://datasheet.ciiva.com/46378/1776116-46378234.pdf?src-supplier=Element14, ComponentLink4URL=https://datasheet.ciiva.com/46378/1776116-46378234.pdf?src-supplier=Element14, ComponentLink5Description=https://datasheet.ciiva.com/16780/70068849-16780139.pdf?src-supplier=Allied+Electronics, ComponentLink5URL=https://datasheet.ciiva.com/16780/70068849-16780139.pdf?src-supplier=Allied+Electronics, ComponentLink6Description=https://datasheet.ciiva.com/9117/aoa0000ce26-9117229.pdf?src-supplier=Avnet, ComponentLink6URL=https://datasheet.ciiva.com/9117/aoa0000ce26-9117229.pdf?src-supplier=Avnet, ComponentLink7Description=https://datasheet.ciiva.com/16511/aoa0000ce26-16511566.pdf?src-supplier=Avnet+Asia, ComponentLink7URL=https://datasheet.ciiva.com/16511/aoa0000ce26-16511566.pdf?src-supplier=Avnet+Asia, ComponentLink8Description=https://datasheet.ciiva.com/30225/54aoa0000ce26-30225311.pdf?src-supplier=Onlinecomponents.com, ComponentLink8URL=https://datasheet.ciiva.com/30225/54aoa0000ce26-30225311.pdf?src-supplier=Onlinecomponents.com, Composition="Metal Film,Thin Film", Contact Plating=Tin, Depth=0.5mm, Height=0.016inch, Lead Free="Lead Free", Length=1mm, Military Standard=Not, Mount="Surface Mount", Number of Terminations=2, Packaging="Tape and Reel", Power Rating=63mW, Pricing 1="1=0.22000, 10=0.18800, 100=0.07350, 1000=0.03077, 2500=0.02820, 5000=0.02564 (USD)", Radiation Hardening=No, REACH SVHC="No SVHC", Resistance=100kR, RoHS=Yes, Stock 1=54338, Supplier 1=Digi-Key, Termination=SMD/SMT, Voltage Rating (DC)=25V, Width=0.5mm
R132: library part Resistor, Case Code (Imperial)=0402, Case Code (Metric)=1005, Manufacturer 1=Vishay, Manufacturer Part Number 1=CRCW0402120RFKED, Max Operating Temperature=155°C, Max Power Dissipation=63mW, Min Operating Temperature=-55°C, Package Quantity=10000, Supplier Part Number 1=541-120LCT-ND, Temperature Coefficient=100ppm/°C, Tolerance=1%, Voltage Rating=50V, Case/Package=0402, ComponentLink1Description=https://datasheet.ciiva.com/11817/0900766b80d98824-11817989.pdf?src-supplier=RSComponents, ComponentLink1URL=https://datasheet.ciiva.com/11817/0900766b80d98824-11817989.pdf?src-supplier=RSComponents, ComponentLink2Description=https://datasheet.ciiva.com/2463/dcrcwe3-2463109.pdf?src-supplier=Digi-Key, ComponentLink2URL=https://datasheet.ciiva.com/2463/dcrcwe3-2463109.pdf?src-supplier=Digi-Key, ComponentLink3Description=https://datasheet.ciiva.com/8336/dcrcwe3-8336661.pdf?src-supplier=Avnet, ComponentLink3URL=https://datasheet.ciiva.com/8336/dcrcwe3-8336661.pdf?src-supplier=Avnet, ComponentLink4Description=https://datasheet.ciiva.com/2463/dcrcwe3-2463110.pdf?src-supplier=Digi-Key, ComponentLink4URL=https://datasheet.ciiva.com/2463/dcrcwe3-2463110.pdf?src-supplier=Digi-Key, ComponentLink5Description=https://datasheet.ciiva.com/5550/dcrcwe3-109170-5550502.pdf?src-supplier=Mouser, ComponentLink5URL=https://datasheet.ciiva.com/5550/dcrcwe3-109170-5550502.pdf?src-supplier=Mouser, ComponentLink6Description=https://datasheet.ciiva.com/2463/dcrcwe3-2463111.pdf?src-supplier=Digi-Key, ComponentLink6URL=https://datasheet.ciiva.com/2463/dcrcwe3-2463111.pdf?src-supplier=Digi-Key, ComponentLink7Description=https://datasheet.ciiva.com/3256/dcrcwe3-3256009.pdf?src-supplier=Avnet, ComponentLink7URL=https://datasheet.ciiva.com/3256/dcrcwe3-3256009.pdf?src-supplier=Avnet, ComponentLink8Description=https://datasheet.ciiva.com/7777/1697337-7777194.pdf?src-supplier=Element14, ComponentLink8URL=https://datasheet.ciiva.com/7777/1697337-7777194.pdf?src-supplier=Element14, ComponentLink9Description=https://datasheet.ciiva.com/7777/1697337-7777195.pdf?src-supplier=Element14, ComponentLink9URL=https://datasheet.ciiva.com/7777/1697337-7777195.pdf?src-supplier=Element14, ComponentLink10Description=https://datasheet.ciiva.com/16881/dcrcwe3-16881548.pdf?src-supplier=Avnet+Europe, ComponentLink10URL=https://datasheet.ciiva.com/16881/dcrcwe3-16881548.pdf?src-supplier=Avnet+Europe, ComponentLink11Description=https://datasheet.ciiva.com/16199/dcrcwe3-16199070.pdf?src-supplier=Future+Electronics, ComponentLink11URL=https://datasheet.ciiva.com/16199/dcrcwe3-16199070.pdf?src-supplier=Future+Electronics, ComponentLink12Description=https://datasheet.ciiva.com/22674/1912744-22674687.pdf?src-supplier=Element14, ComponentLink12URL=https://datasheet.ciiva.com/22674/1912744-22674687.pdf?src-supplier=Element14, Composition="Thick Film", Contact Plating=Tin, Depth=0.5mm, Features="Automotive AEC-Q200", Height=0.35mm, Lead Free="Lead Free", Length=1mm, Military Standard=Not, Mount="Surface Mount", Number of Terminations=2, Packaging="Tape and Reel", Power Rating=63mW, Pricing 1="1=0,10000, 10=0,03800, 100=0,01540, 1000=0,00690, 2500=0,00599, 5000=0,00495 (USD)", Radiation Hardening=No, REACH SVHC=Unknown, Resistance=120R, RoHS=Yes, Stock 1=158664, Supplier 1=Digi-Key, Termination=SMD/SMT, Voltage Rating (DC)=50V, Weight=2.3E-05oz, Width=0.02inch, Working Voltage=50V
R133: library part Resistor, Case Code (Imperial)=0402, Case Code (Metric)=1005, Manufacturer 1=Vishay, Manufacturer Part Number 1=CRCW0402300RFKED, Max Operating Temperature=155°C, Max Power Dissipation=63mW, Min Operating Temperature=-55°C, Package Quantity=10, Supplier Part Number 1=541-300LCT-ND, Temperature Coefficient=100ppm/°C, Tolerance=1%, Voltage Rating=50V, Case/Package=0402, ComponentLink1Description=https://datasheet.ciiva.com/11809/0900766b80d98824-11809173.pdf?src-supplier=RSComponents, ComponentLink1URL=https://datasheet.ciiva.com/11809/0900766b80d98824-11809173.pdf?src-supplier=RSComponents, ComponentLink2Description=https://datasheet.ciiva.com/16394/dcrcwe3-16394469.pdf?src-supplier=Future+Electronics, ComponentLink2URL=https://datasheet.ciiva.com/16394/dcrcwe3-16394469.pdf?src-supplier=Future+Electronics, ComponentLink3Description=https://datasheet.ciiva.com/2464/dcrcwe3-2464423.pdf?src-supplier=Digi-Key, ComponentLink3URL=https://datasheet.ciiva.com/2464/dcrcwe3-2464423.pdf?src-supplier=Digi-Key, ComponentLink4Description=https://datasheet.ciiva.com/2464/dcrcwe3-2464424.pdf?src-supplier=Digi-Key, ComponentLink4URL=https://datasheet.ciiva.com/2464/dcrcwe3-2464424.pdf?src-supplier=Digi-Key, ComponentLink5Description=https://datasheet.ciiva.com/7690/1697337-7690664.pdf?src-supplier=Element14, ComponentLink5URL=https://datasheet.ciiva.com/7690/1697337-7690664.pdf?src-supplier=Element14, ComponentLink6Description=https://datasheet.ciiva.com/2464/dcrcwe3-2464425.pdf?src-supplier=Digi-Key, ComponentLink6URL=https://datasheet.ciiva.com/2464/dcrcwe3-2464425.pdf?src-supplier=Digi-Key, ComponentLink7Description=https://datasheet.ciiva.com/7690/1697337-7690665.pdf?src-supplier=Element14, ComponentLink7URL=https://datasheet.ciiva.com/7690/1697337-7690665.pdf?src-supplier=Element14, ComponentLink8Description=https://datasheet.ciiva.com/22675/1912744-22675083.pdf?src-supplier=Element14, ComponentLink8URL=https://datasheet.ciiva.com/22675/1912744-22675083.pdf?src-supplier=Element14, ComponentLink9Description=https://datasheet.ciiva.com/5547/dcrcwe3-109170-5547615.pdf?src-supplier=Mouser, ComponentLink9URL=https://datasheet.ciiva.com/5547/dcrcwe3-109170-5547615.pdf?src-supplier=Mouser, Composition="Thick Film", Contact Plating=Tin, Depth=0.5mm, Features="Automotive AEC-Q200", Height=0.35mm, Lead Free="Lead Free", Length=1mm, Military Standard=Not, Mount="Surface Mount", Number of Terminations=2, Packaging="Tape and Reel", Power Rating=63mW, Pricing 1="1=0,10000, 10=0,03800, 100=0,01540, 1000=0,00690, 2500=0,00599, 5000=0,00495 (USD)", Radiation Hardening=No, REACH SVHC=Unknown, Resistance=300R, RoHS=Yes, Stock 1=11043, Supplier 1=Digi-Key, Termination=SMD/SMT, Voltage Rating (DC)=50V, Weight=2.3E-05oz, Width=0.02inch
R?: library part Resistor, "Thin Film Resistors CPF 0402 40K2 0.1% 25PPM 1K RL", Case Code (Imperial)=0402, Case Code (Metric)=1005, Manufacturer="TE Connectivity", Manufacturer Part Number=CPF0402B40K2E1, Max Operating Temperature=155°C, Min Operating Temperature=-55°C, Number of Resistors=1, Package Quantity=1000, Power Rating=63mW, Supplier Part Number 1=A102847CT-ND, Temperature Coefficient=25ppm/°C, Tolerance=0.1%, Voltage Rating=25V, Case/Package=0402, Category="Chip SMD Resistors", ComponentLink1Description=https://datasheet.ciiva.com/11812/0900766b80de4f6c-11812581.pdf?src-supplier=RSComponents, ComponentLink1URL=https://datasheet.ciiva.com/11812/0900766b80de4f6c-11812581.pdf?src-supplier=RSComponents, ComponentLink2Description=https://datasheet.ciiva.com/12729/eng-ds-1773200-i-12729533.pdf?src-supplier=Mouser, ComponentLink2URL=https://datasheet.ciiva.com/12729/eng-ds-1773200-i-12729533.pdf?src-supplier=Mouser, Composition="Thin Film", Depth=0.5mm, ELV=Compliant, Height=0.3mm, Length=1mm, Mount="Surface Mount", Number of Terminations=2, Packaging="Tape and Reel", Pricing 1="1=0,47000, 10=0,34900, 100=0,20320 (USD)", REACH SVHC="No SVHC", Resistance=40.2kR, RoHS=Yes, Stock 1=3851, Supplier 1=Digi-Key, Termination=Solder, Voltage Rating (DC)=25V, Weight=2.3E-05oz, Width=0.5mm
R?: library part Resistor, "RES 11.1K OHM 0.1% 1/10W 0402", Case Code (Imperial)=0402, Case Code (Metric)=1005, Manufacturer="Vishay Dale", Manufacturer Part Number=TNPW040211K1BEED, Max Operating Temperature=125°C, Max Power Dissipation=63mW, Min Operating Temperature=-55°C, Supplier Part Number 1=541-2066-1-ND, Temperature Coefficient=25ppm/°C, Tolerance=0.1%, Case/Package=0402, Category="Chip SMD Resistors", ComponentLink1Description=http://www.vishay.com/docs/49252/_dbr_smd_resistor_product_overview_vmn_sg2189_1705.pdf?src-supplier=Digi-Key, ComponentLink1URL=http://www.vishay.com/docs/49252/_dbr_smd_resistor_product_overview_vmn_sg2189_1705.pdf?src-supplier=Digi-Key, ComponentLink2Description=http://www.vishay.com/docs/28758/tnpw_e3.pdf?src-supplier=Digi-Key, ComponentLink2URL=http://www.vishay.com/docs/28758/tnpw_e3.pdf?src-supplier=Digi-Key, ComponentLink3Description=http://www.vishay.com/docs/28758/tnpw_e3.pdf?src-supplier=Avnet, ComponentLink3URL=http://www.vishay.com/docs/28758/tnpw_e3.pdf?src-supplier=Avnet, Composition="Thin Film", Contact Plating=Tin, Features="Moisture Resistant,Automotive AEC-Q200,Anti-Sulfur", Height=0.016inch, Length=0.039inch, Number of Terminations=2, Packaging="Tape and Reel", Pricing 1="1=0,62000, 10=0,44000, 100=0,22880, 1000=0,12320, 2500=0,11968 (USD)", Radiation Hardening=No, Resistance=11.1kR, RoHS=Yes, Stock 1=33802, Supplier 1=Digi-Key, Width=0.02inch
R?: library part Resistor, "Res Thick Film 0402 6.8M Ohm 1% 0.1W(1/10W) +/-200ppm/ßC Pad SMD Automotive T/R", Case Code (Imperial)=0402, Case Code (Metric)=1005, Manufacturer="KOA Speer", Manufacturer Part Number=RK73H1ETTP6804F, Max Operating Temperature=155°C, Min Operating Temperature=-55°C, Power Rating=63mW, Supplier Part Number 1=2019-RK73H1ETTP6804FCT-ND, Temperature Coefficient=100ppm/°C, Tolerance=1%, Voltage Rating=50V, Case/Package=0402, Category="Chip SMD Resistors", ComponentLink1Description=http://www.mouser.com/ds/2/219/RK73H-5715.pdf?src-supplier=Mouser, ComponentLink1URL=http://www.mouser.com/ds/2/219/RK73H-5715.pdf?src-supplier=Mouser, Composition="Thick Film", Depth=0.5mm, Lead Free="Lead Free", Length=1mm, Military Standard=Not, Packaging="Tape and Reel", Pricing 1="1=0,10000, 10=0,02400, 100=0,00970, 1000=0,00437, 2500=0,00380, 5000=0,00314 (USD)", Resistance=6.8MR, RoHS=Yes, Stock 1=4220, Supplier 1=Digi-Key, Termination=SMD/SMT
T1: "RF Transformer 1.414: 1 4Term. SMD", Case/Package=SMD/SMT, Current Rating=600mA, Manufacturer="TE Connectivity MA-COM", Max Operating Temperature=85°C, Min Operating Temperature=-40°C, Package Quantity=900, Power Rating=250mW, Supplier Part Number 1=1465-1304-1-ND, ComponentLink1Description=https://datasheet.ciiva.com/29655/maba-007681-ct2010-29655680.pdf?src-supplier=Digi-Key, ComponentLink1URL=https://datasheet.ciiva.com/29655/maba-007681-ct2010-29655680.pdf?src-supplier=Digi-Key, ComponentLink2Description=https://datasheet.ciiva.com/15154/getdatasheetpartid-721834-15154840.pdf?src-supplier=Verical, ComponentLink2URL=https://datasheet.ciiva.com/15154/getdatasheetpartid-721834-15154840.pdf?src-supplier=Verical, ComponentLink3Description=https://datasheet.ciiva.com/3296/maba-007681-ct2010-3296009.pdf?src-supplier=Avnet, ComponentLink3URL=https://datasheet.ciiva.com/3296/maba-007681-ct2010-3296009.pdf?src-supplier=Avnet, Depth=6.35mm, Height=3.33mm, Length=7.11mm, Manufacturer Part Number=MABA-007681-CT2010, Max DC Current=600mA, Mount="Surface Mount", Number of Pins=4, Packaging="Tape and Reel", Pricing 1="1 = 2,84000, 10 = 2,27000, 25 = 1,84480, 50 = 1,79740, 100 = 1,75010, 250 = 1,70280 (USD)", Radiation Hardening=No, RoHS=Yes, Stock 1=1606, Supplier 1=Digi-Key, Termination=SMD/SMT, Turns Ratio=1.414:1, Width=6.35mm
T2: "RF Transformer 1: 1CT 0.3MHz to 200MHz Surface Mount", Case/Package=SMD/SMT, Manufacturer 1="TE Connectivity MA-COM", Max DC Current=500mA, Max Operating Temperature=85°C, Min Operating Temperature=-40°C, Package Quantity=2000, Power Rating=500mW, Supplier Part Number 1=1465-1317-1-ND, ComponentLink1Description=https://datasheet.ciiva.com/3295/ds-mabaes0060-v5-3295936.pdf?src-supplier=Avnet, ComponentLink1URL=https://datasheet.ciiva.com/3295/ds-mabaes0060-v5-3295936.pdf?src-supplier=Avnet, ComponentLink2Description=https://datasheet.ciiva.com/29655/mabaes0060-v6-29655622.pdf?src-supplier=Digi-Key, ComponentLink2URL=https://datasheet.ciiva.com/29655/mabaes0060-v6-29655622.pdf?src-supplier=Digi-Key, ComponentLink3Description=https://datasheet.ciiva.com/4550/ds-mabaes0060-v5-14473-4550847.pdf?src-supplier=Mouser, ComponentLink3URL=https://datasheet.ciiva.com/4550/ds-mabaes0060-v5-14473-4550847.pdf?src-supplier=Mouser, ComponentLink4Description=https://datasheet.ciiva.com/29655/mabaes0060-v6-29655623.pdf?src-supplier=Digi-Key, ComponentLink4URL=https://datasheet.ciiva.com/29655/mabaes0060-v6-29655623.pdf?src-supplier=Digi-Key, ComponentLink5Description=https://datasheet.ciiva.com/29655/mabaes0060-v6-29655624.pdf?src-supplier=Digi-Key, ComponentLink5URL=https://datasheet.ciiva.com/29655/mabaes0060-v6-29655624.pdf?src-supplier=Digi-Key, Depth=3.81mm, Height=2.67mm, Insertion Loss=1.5dB, Lead Free="Lead Free", Lead/Base Style="Gull Wing", Length=3.81mm, Manufacturer Part Number 1=MABAES0060, Mount="Surface Mount", Number of Pins=5, Packaging="Tape and Reel", Pricing 1="1=2.44000, 10=1.95400, 25=1.58720, 50=1.54660, 100=1.50590, 250=1.46520, 500=1.45300, 1000=1.28612 (USD)", Radiation Hardening=No, RoHS=Yes, Stock 1=4134, Supplier 1=Digi-Key, Termination=SMD/SMT, Turns Ratio=1:1, Width=3.81mm